# Altium PCB IR Sensor.PcbDoc
Units mil, origin at the board's own origin, x right, y up, seen from the top; angles counter-clockwise.
Board outline 1574.8 x 590.55 mil, 2 copper layers (Top, Bottom), stack 62.192 mil thick; 9 components, 7 nets, 26 pads, 3 vias.
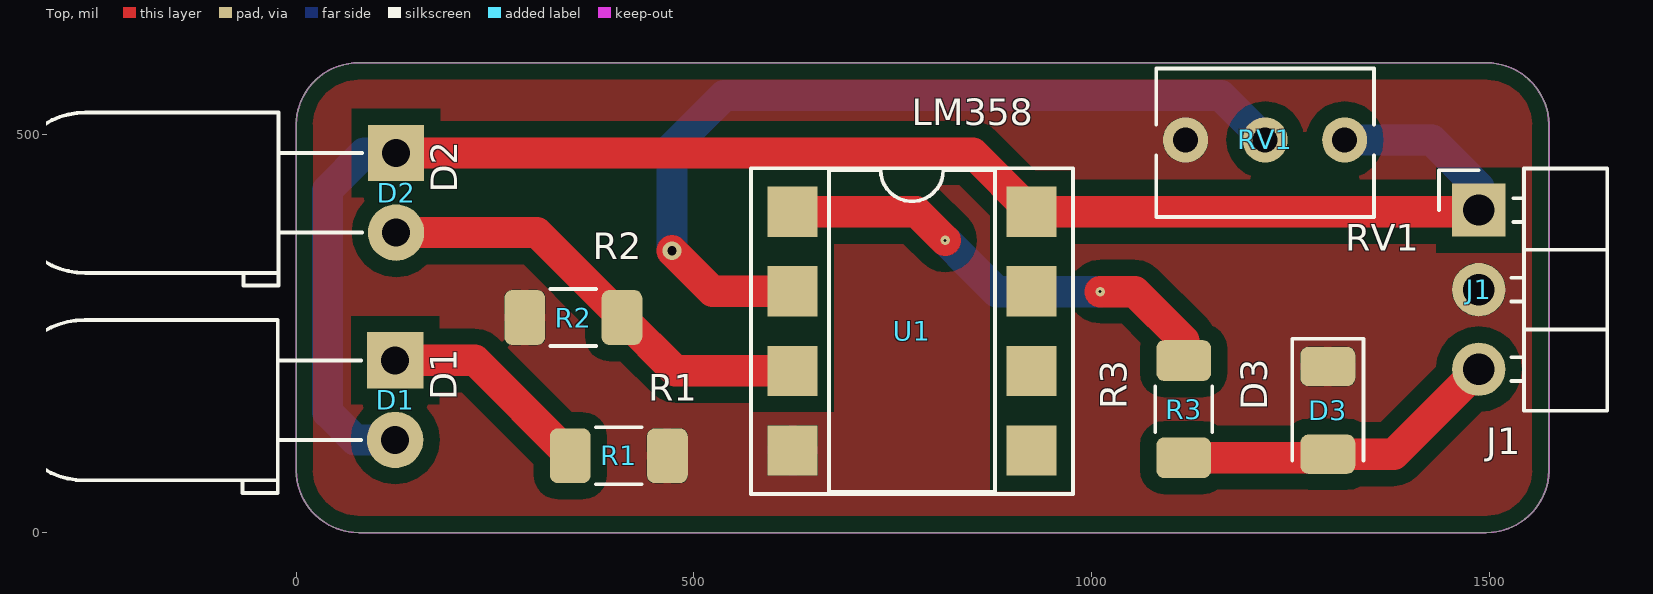
[diagram p0: Top view]
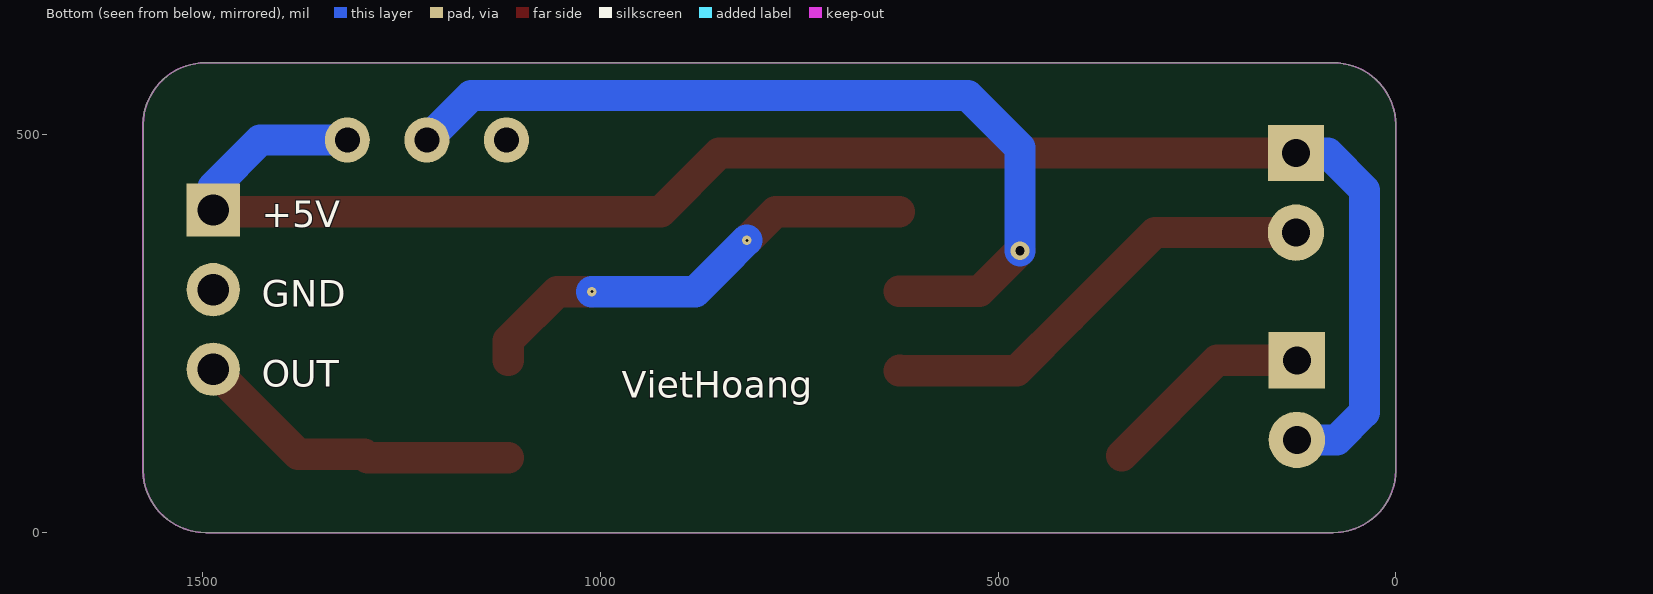
[diagram p1: Bottom view, seen from below]
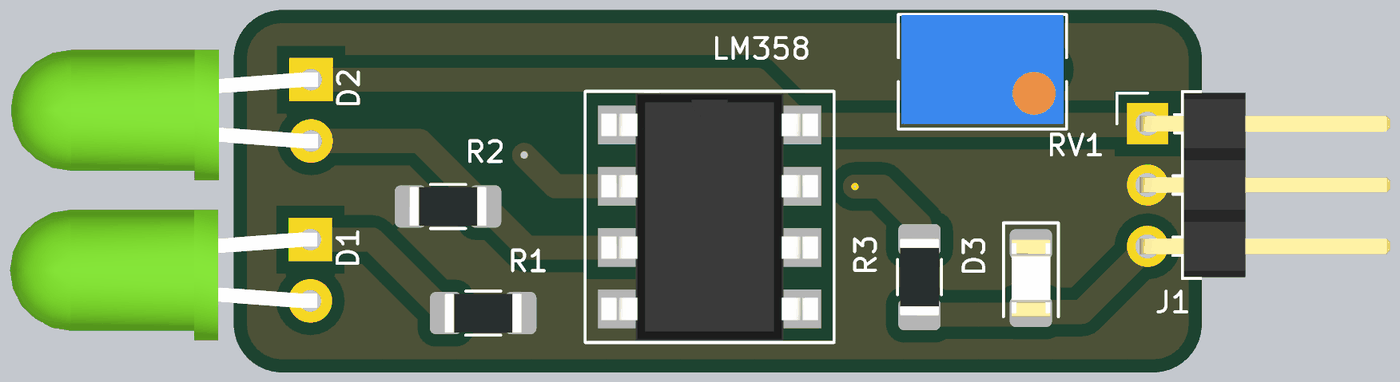
[diagram p2: 3D render of the assembled board from above, using the file's embedded part models]

## Layer stack, top to bottom
Top Solder: solder mask 0.4, Solder Resist, Dk 3.5
Top: signal copper 1.4
Dielectric 1: dielectric 59.3921, FR-4, Dk 4.8
Bottom: signal copper 1.4
Bottom Solder: solder mask 0.4, Solder Resist, Dk 3.5

## Board outline
1574.8,78.74 cw(c1496.06,78.74) 1496.06,0 433.07,0 78.74,0 cw(c78.74,78.74) 0,78.74 0,314.96 0,393.7 0,472.44 0,511.81 cw(c78.74,511.81) 78.74,590.55 433.07,590.55 1496.06,590.55 cw(c1496.06,511.81) 1574.8,511.81 1574.8,472.44 1574.8,393.7

## Design rules (kind name [scope] priority, off if disabled: settings)
BoardOutlineClearance mdCopperDimension [All] p1: gap=10 ignorepadtopadclearanceinfootprint=FALSE except(0: Arc-SplitContinuation Track-SplitContinuation SMDPad-SplitContinuation THPad-SplitContinuation Via-SplitContinuation Fill-SplitContinuation Poly-SplitContinuation Region-SplitContinuation Text-SplitContinuation; 11.81: Poly-OutlineEdge Poly-CavityEdge Poly-CutoutEdge Poly-SplitBarrior)
Clearance Clearance_for_PolygonClass_Isolate_20 [InPolygonClass('Isolate_20') vs IsArc Or IsTrack Or IsPad Or IsVia Or IsFill Or IsRegion Or IsText] p1: gap=20 ignorepadtopadclearanceinfootprint=FALSE
Clearance "Clearance (Same Net)" [All] p2: gap=7.87 ignorepadtopadclearanceinfootprint=FALSE
Clearance [All] p3: gap=7.87 ignorepadtopadclearanceinfootprint=FALSE
MinimumSolderMaskSliver [All] p1 off: minsoldermaskwidth=10
PasteMaskExpansion mlMinCreamFrame [All] p1: expansion=0
PolygonConnect PolygonConnect_For_PolygonThermal_ON_Width98400_Gap0 [InPolygonClass('PolygonThermal_ON_Width98400_Gap0') vs Not IsVia] p1: connectstyle=Relief reliefconductorwidth=9.84 reliefentries=4 polygonreliefangle="90 Angle" airgapwidth=0
PolygonConnect [All] p2: connectstyle=Relief reliefconductorwidth=10 reliefentries=4 polygonreliefangle="90 Angle" airgapwidth=10
RoutingVias [All] p1: holewidth=20 width=60 viastyle="Through Hole" minholewidth=20 minwidth=60 maxholewidth=100 maxwidth=100
SolderMaskExpansion mlMinStopFrame [All] p1: expansion=0 istentingtop=FALSE
Width [All] p1: maxlimit=10 minlimit=10 preferedwidth=10
28 further rules are at their usual default settings.

## Classes and differential pairs
polygon class PolygonThermal_ON_Width98400_Gap0: Polygon_1_Net_GND
polygon class Isolate_20: Polygon_1_Net_GND

## Components (designator, comment, footprint, x,y, rotation, side; value= is the part's Value field where it differs from the comment)
D1 "LED" D1 124.49,216.42 r0 top
D2 "LED" D2 125.59,477.08 r0 top
D3 "LED" D3 1296.89,153.59 r0 top
J1 "POWER_CON" J1 1486.63,405.35 r0 top
R1 "100" R1 405.68,96.54 r0 top
R2 "10k" R2 348.48,270.32 r0 top
R3 "330" R3 1115.62,155.19 r0 top
RV1 "10k" RV1 1317.99,493.48 r0 top
U1 "LM358" U1 774.12,253.33 r0 top

## Footprints (in the part's own frame and the unit in brackets; to place one, negate y for a bottom-side part, rotate by r counter-clockwise, add the part's x,y. Pads: shape width x height; smd on the part's side, far side on the other; paste and mask are expansions set on the pad)
D1 [mil] "D1"
  rect 70.87x70.87 / inner round 65.48 / far side rect 70.87x70.87 hole 35.43: 1(0,0)
  round 70.87 hole 35.43: 2(0,-100)
  silkscreen extent -491,-167 -43,51, body extent -489,-164 12,48, height 232
D2 [mil] "D2"
  rect 70.87x70.87 / inner round 65.48 / far side rect 70.87x70.87 hole 35.43: 1(0,0)
  round 70.87 hole 35.43: 2(0,-100)
  silkscreen extent -491,-167 -43,51, body extent -489,-164 12,48, height 232
D3 [mil] "D3"
  rrect40% 68.9x49.21 smd: 1(0,55.12) 2(0,-55.12)
  silkscreen extent -45,-63 45,90, body extent -31,-63 31,63, height 43
J1 [mm] "J1"
  rect 1.7x1.7 / inner round 1.571 / far side rect 1.7x1.7 hole 1: 1(0,0)
  round 1.7 hole 1: 2(0,-2.54) 3(0,-5.08)
  silkscreen extent -1.27,-6.41 4.1,1.33, body extent -0.32,-6.35 10.04,1.27, height 2.54
R1 [mil] "R1"
  rrect38% 51.18x68.9 smd: 1(-61.02,0) 2(61.02,0)
  silkscreen extent -29,-36 29,36, body extent -63,-31 63,31, height 22
R2 [mil] "R2"
  rrect38% 51.18x68.9 smd: 1(61.02,0) 2(-61.02,0)
  silkscreen extent -29,-36 29,36, body extent -63,-31 63,31, height 22
R3 [mil] "R3"
  rrect38% 68.9x51.18 smd: 1(0,-61.02) 2(0,61.02)
  silkscreen extent -36,-29 36,29, body extent -31,-63 31,63, height 22
RV1 [mil] "RV1"
  round 56.69 hole 31.5: 1(0,0) 2(-100,0) 3(-200,0)
  silkscreen extent -237,-97 37,90, body extent -232,-89 32,89, height 325
U1 [mil] "U1"
  rect 62.99x62.99 smd: 1(-150,150) 2(-150,50) 3(-150,-50) 4(-150,-150) 5(150,-150) 6(150,-50) 7(150,50) 8(150,150)
  silkscreen extent -202,-205 202,205, body extent -176,-202 176,202, height 145

## Part data
D1: library part D1, DeviceSetName=D1, GateName_1=G$1, LibraryName=IR_SENSOR, SymbolName_1=D1
D2: library part D2, DeviceSetName=D2, GateName_1=G$1, LibraryName=IR_SENSOR, SymbolName_1=D2
D3: library part D3, DeviceSetName=D3, GateName_1=G$1, LibraryName=IR_SENSOR, SymbolName_1=D3
J1: library part J1, DeviceSetName=J1, GateName_1=G$1, LibraryName=IR_SENSOR, SymbolName_1=J1
R1: library part R1, DeviceSetName=R1, GateName_1=G$1, LibraryName=IR_SENSOR, SymbolName_1=R1
R2: library part R2, DeviceSetName=R2, GateName_1=G$1, LibraryName=IR_SENSOR, SymbolName_1=R2
R3: library part R3, DeviceSetName=R3, GateName_1=G$1, LibraryName=IR_SENSOR, SymbolName_1=R3
RV1: library part RV1, DeviceSetName=RV1, GateName_1=G$1, LibraryName=IR_SENSOR, SymbolName_1=RV1
U1: library part U1, +=+, -=-, DeviceSetName=U1, GateName_1=G$1, LibraryName=IR_SENSOR, SymbolName_1=U1

## Via types
v1: diameter 11.81/11.81 (per signal layer), hole 3.94, Top to Bottom, 2 vias
v2: diameter 23.62/23.62 (per signal layer), hole 11.81, Top to Bottom, 1 vias

## Nets (pads, with @x,y where several pads share a name; then routed paths per layer and width w, separated by ;. In a path a pad name is that pad's centre, name@x,y a point inside that pad or via, vN(x,y) a via of type N, cw(c..) or ccw(c..) an arc to the next point about the centre after c; other vN are vias at no path point)
+5V: D1.2 D2.1 J1.1 RV1.1 U1.8 | length 2098.8
  Top w39.37: D2.1 850.37,477.08 U1.8 1484.62,403.33 J1.1
  Bottom w39.37: D1.2 74.38,116.42 39.37,151.43 39.37,430.67 85.77,477.06 D2.1 ; RV1.1 1427.34,493.48 1486.63,434.19 J1.1
CMP_OUT: R3.2 U1.1 | length 583.8
  Top w39.37: U1.1 779.72,403.33 v1(815.75,367.31) ; v1(1010.65,302.86) 1054.3,302.86 1115.62,241.54 R3.2
  Bottom w39.37: v1(815.75,367.31) 816.14,367.31 849.18,334.27 880.58,302.86 v1(1010.65,302.86)
GND: D3.1 J1.2 R1.2 R2.2 RV1.3 U1.4
IR_LED_K: D1.1 R1.1 | length 269.8
  Top w39.37: D1.1 224.77,216.42 R1.1@344.65,96.54
IR_SENSE: D2.2 R2.1 U1.3 | length 571.4
  Top w39.37: D2.2 302.74,377.08 R2.1 476.49,203.33 U1.3 U1.3@623.49,203.96
OUT: D3.2 J1.3 R3.1 | length 417.1
  Top w39.37: R3.1 1292.59,94.17 D3.2 1379.75,98.47 J1.3
VREF: RV1.2 U1.2 | length 1098.1
  Top w39.37: v2(472.44,354.33) 523.44,303.33 U1.2
  Bottom w39.37: v2(472.44,354.33) 472.44,483.66 538.16,549.39 1162.08,549.39 RV1.2
pads on no net: U1.5 U1.6 U1.7

## Polygon pours and split planes (outlines as drawn)
GND on Top "Polygon_1_Net_GND" (solid, remove dead copper, pour order 0): -44.29,713.58 1658.46,713.58 1658.46,-123.03 -44.29,-123.03

## Keep-outs
Keep-Out Layer:
  lines w1.97: 0,78.74 ccw(c78.74,78.74) 78.74,0 433.07,0 1496.06,0 ccw(c1496.06,78.74) 1574.8,78.74 1574.8,314.96 1574.8,393.7 1574.8,472.44 1574.8,511.81 ccw(c1496.06,511.81) 1496.06,590.55 433.07,590.55 78.74,590.55 ccw(c78.74,511.81) 0,511.81 0,472.44 0,393.7 0,314.96 0,78.74

## Silkscreen, mask and mechanical layers (free items; w line width, h text height)
Bottom Overlay:
  text "+5V" at 1425.6,383.6 h33.46
  text "GND" at 1425.6,283.6 h33.46
  text "OUT" at 1425.6,183.6 h33.46
  text "VietHoang" at 972.85,169.49 h33.46
Dimension:
  lines w1.97: 0,78.74 ccw(c78.74,78.74) 78.74,0 433.07,0 1496.06,0 ccw(c1496.06,78.74) 1574.8,78.74 1574.8,314.96 1574.8,393.7 1574.8,472.44 1574.8,511.81 ccw(c1496.06,511.81) 1496.06,590.55 433.07,590.55 78.74,590.55 ccw(c78.74,511.81) 0,511.81 0,472.44 0,393.7 0,314.96 0,78.74